# Altium PCB BOARD_4LAYER.PcbDoc (part 8 of 21)
Units mil, origin at the board's own origin, x right, y up, seen from the top; angles counter-clockwise.
Board outline 6692.91 x 10039.37 mil, 4 copper layers (Top Layer, Mid Layer 1, Mid Layer 2, Bottom Layer), stack 66.299 mil thick; 1532 components, 908 nets, 4105 pads, 1286 vias.
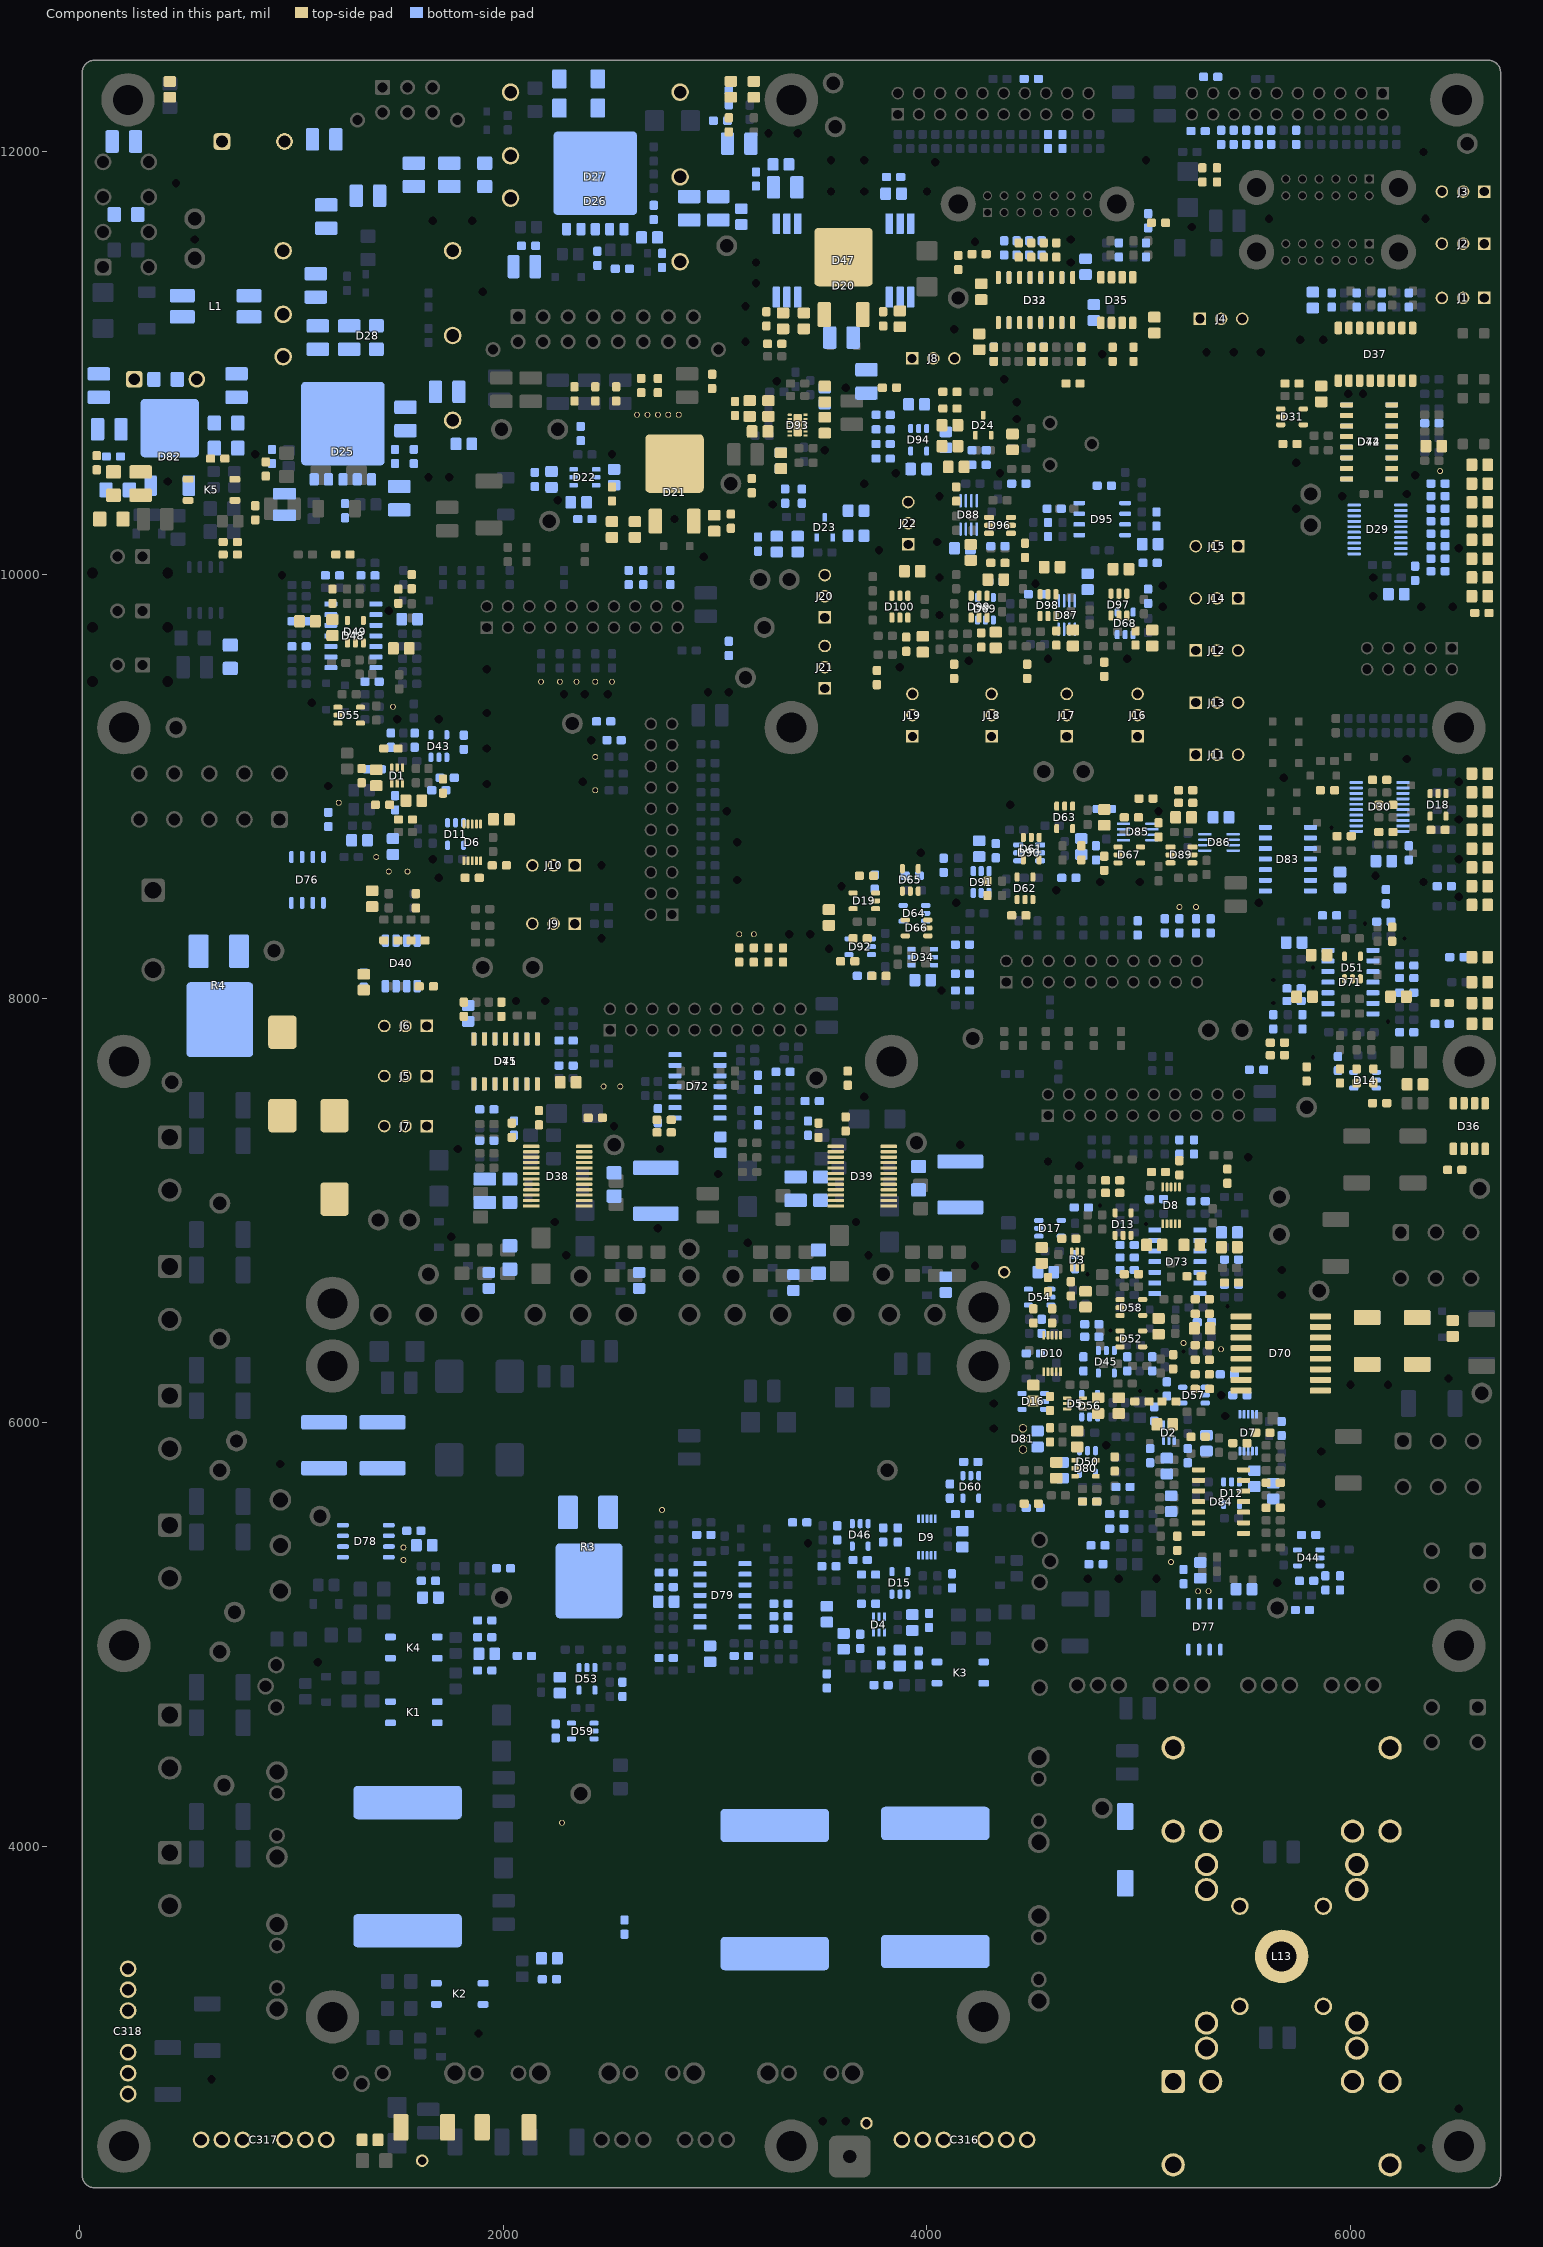
[diagram p10: the components of this part, seen from the top]

## Components (designator, comment, footprint, x,y, rotation, side; value= is the part's Value field where it differs from the comment) (continued)
C35 "CL10B104KB8SFNC" 0603-STANDART-1608 3281.5,11090.55 r180 top locked
C36 "CL10B104KB8SFNC" 0603-STANDART-1608 3842.52,11877.95 r0 bottom
C37 "CL10B104KB8SFNC" 0603-STANDART-1608 3192.91,11868.11 r90 bottom
C38 "CL10B104KB8SFNC" 0603-STANDART-1608 3793.31,11208.66 r90 top
C39 "CL10B104KB8SFNC" 0603-STANDART-1608 2149.61,10450.79 r90 bottom
C40 "CL10B104KB8SFNC" 0603-STANDART-1608 2385.83,10263.78 r180 bottom
C41 "CL10B104KB8SFNC" 0603-STANDART-1608 3064.96,12251.97 r270 bottom
C42 "CL10B104KB8SFNC" 0603-STANDART-1608 5368.11,11887.8 r270 top
C43 "CL10B104KB8SFNC" 0603-STANDART-1608 5299.21,11887.8 r270 top
C44 "CL10B104KB8SFNC" 0603-STANDART-1608 4147.64,11474.41 r90 top
C45 "CL10B104KB8SFNC" 0603-STANDART-1608 3409.45,10372.05 r270 bottom locked
C46 "CL10B104KB8SFNC" 0603-STANDART-1608 1490.16,10559.06 r90 bottom
C47 "CL10B104KB8SFNC" 0603-STANDART-1608 161.42,10559.06 r180 bottom
C48 "CL10B104KB8SFNC" 0603-STANDART-1608 2562.99,11444.88 r180 bottom
C49 "CL10B104KB8SFNC" 0603-STANDART-1608 2444.88,11494.09 r270 bottom
C50 "CL10B104KB8SFNC" 0603-STANDART-1608 2750,11484.25 r90 bottom
C51 "CL10B104KB8SFNC" 0603-STANDART-1608 3074.8,10253.94 r90 top
C52 "CL10B104KB8SFNC" 0603-STANDART-1608 879.92,10500 r270 top
C53 "CL10B104KB8SFNC" 0603-STANDART-1608 1253.94,10303.15 r270 bottom
C54 "CL10B104KB8SFNC" 0603-STANDART-1608 4875.98,7084.65 r180 top
C55 "CL10B104KB8SFNC" 0603-STANDART-1608 5732.28,8049.21 r0 bottom
C56 "CL10B104KB8SFNC" 0603-STANDART-1608 6263.78,8098.43 r180 bottom
C57 "CL10B104KB8SFNC" 0603-STANDART-1608 5938.98,7694.88 r270 bottom
C58 "CL10B104KB8SFNC" 0603-STANDART-1608 4944.88,6779.53 r0 bottom
C59 "CL10B104KB8SFNC" 0603-STANDART-1608 5437.01,6769.69 r180 bottom
C60 "CL10B104KB8SFNC" 0603-STANDART-1608 5299.21,6513.78 r0 top
C61 "CL10B104KB8SFNC" 0603-STANDART-1608 4964.57,6700.79 r0 top
C62 "CL10B104KB8SFNC" 0603-STANDART-1608 5437.01,6651.57 r180 bottom
C63 "CL10B104KB8SFNC" 0603-STANDART-1608 4118.11,5253.94 r90 bottom
C64 "CL10B104KB8SFNC" 0603-STANDART-1608 3311.02,5086.61 r180 bottom
C65 "CL10B104KB8SFNC" 0603-STANDART-1608 2769.68,5224.41 r0 bottom
C66 "CL10B104KB8SFNC" 0603-STANDART-1608 2248.03,4545.28 r90 bottom
C67 "CL10B104KB8SFNC" 0603-STANDART-1608 1647.64,5253.94 r180 bottom
C68 "CL10B104KB8SFNC" 0603-STANDART-1608 3960.63,4889.76 r270 bottom
C69 "CL10B104KB8SFNC" 0603-STANDART-1608 2769.68,5293.31 r0 bottom
C70 "CL10B104KB8SFNC" 0603-STANDART-1608 2218.5,3374.02 r180 bottom
C71 "CL10B104KB8SFNC" 0603-STANDART-1608 1913.39,4988.19 r180 bottom
C72 "CL10B104KB8SFNC" 0603-STANDART-1608 4501.97,6326.77 r180 bottom
C73 "CL10B104KB8SFNC" 0603-STANDART-1608 4698.82,6759.84 r90 bottom
C74 "CL10B104KB8SFNC" 0603-STANDART-1608 712.6,10155.51 r180 top
C75 "CL10B104KB8SFNC" 0603-STANDART-1608 6411.42,8797.24 r0 top
C76 "CL10B104KB8SFNC" 0603-STANDART-1608 5220.47,8925.2 r0 top
C77 "CL10B104KB8SFNC" 0603-STANDART-1608 4285.43,8521.65 r90 top
C78 "CL10B104KB8SFNC" 0603-STANDART-1608 4669.29,8570.87 r180 bottom
C79 "CL10B104KB8SFNC" 0603-STANDART-1608 3773.62,8108.27 r0 top
C80 "CL10B104KB8SFNC" 0603-STANDART-1608 4078.74,8629.92 r90 bottom
C81 "CL10B104KB8SFNC" 0603-STANDART-1608 4836.61,8895.67 r180 bottom
C82 "CL10B104KB8SFNC" 0603-STANDART-1608 4964.57,8856.3 r0 top
C83 "CL10B104KB8SFNC" 0603-STANDART-1608 3793.31,10618.11 r180 bottom
C84 "CL10B104KB8SFNC" 0603-STANDART-1608 3793.31,10755.91 r180 bottom
C85 "CL10B104KB8SFNC" 0603-STANDART-1608 4108.27,10785.43 r0 top
C86 "CL10B104KB8SFNC" 0603-STANDART-1608 4836.61,10421.26 r0 bottom
C87 "CL10B104KB8SFNC" 0603-STANDART-1608 5053.15,10057.09 r180 bottom
C88 "CL10B104KB8SFNC" 0603-STANDART-1608 4334.65,10057.09 r180 top
C89 "CL10B104KB8SFNC" 0603-STANDART-1608 4984.25,9702.76 r90 top
C90 "CL10B104KB8SFNC" 0603-STANDART-1608 4610.24,9702.76 r90 top
C91 "CL10B104KB8SFNC" 0603-STANDART-1608 4255.91,9692.91 r90 top
C92 "CL10B104KB8SFNC" 0603-STANDART-1608 3901.57,9673.23 r90 top
C93 "CL10B104KB8SFNC" 0603-STANDART-1608 4324.8,9968.5 r0 bottom
C94 "CL10B104KB8SFNC" 0603-STANDART-1608 5043.31,9899.61 r270 bottom
C95 "GRM1885C1H101JA01D" 0603-STANDART-1608 1431.1,8915.35 r0 top
C96 "GRM1885C1H101JA01D" 0603-STANDART-1608 5072.83,6041.34 r90 bottom
C97 "GRM1885C1H101JA01D" 0603-STANDART-1608 4669.29,6868.11 r0 top
C98 "GRM1885C1H101JA01D" 0603-STANDART-1608 3724.41,5145.67 r0 bottom
C99 "GRM1885C1H101JA01D" 0603-STANDART-1608 4767.72,5627.95 r180 top
C100 "GRM216R71H103KA01D" 0805-STANDART-2012 1401.57,9043.31 r90 top
C101 "GRM216R71H103KA01D" 0805-STANDART-2012 5131.89,5795.28 r90 bottom
C102 "GRM216R71H103KA01D" 0805-STANDART-2012 4748.03,6582.68 r90 top
C103 "GRM216R71H103KA01D" 0805-STANDART-2012 3606.3,4968.5 r270 bottom
C104 "CL21B225KOFNNNE" 0805-STANDART-2012 6391.73,10608.27 r180 top
C105 "CL21B225KOFNNNE" 0805-STANDART-2012 5860.24,10854.33 r270 top
C106 "CL21B225KOFNNNE" 0805-STANDART-2012 5072.83,11179.13 r270 top
C107 "CL21B225KOFNNNE" 0805-STANDART-2012 5820.87,11297.24 r90 bottom
C108 "CL21B225KOFNNNE" 0805-STANDART-2012 2307.09,7606.3 r180 top
C109 "CL21B225KOFNNNE" 0805-STANDART-2012 1992.13,8846.46 r180 top
C110 "CL21B225KOFNNNE" 0805-STANDART-2012 1578.74,8935.04 r180 top
C111 "CL21B225KOFNNNE" 0805-STANDART-2012 5545.28,5736.22 r90 bottom
C112 "CL21B225KOFNNNE" 0805-STANDART-2012 5318.9,5903.54 r90 bottom
C113 "CL21B225KOFNNNE" 0805-STANDART-2012 1194.88,9751.97 r90 top
C114 "CL21B225KOFNNNE" 0805-STANDART-2012 4639.76,5775.59 r270 bottom
C115 "CL21B225KOFNNNE" 0805-STANDART-2012 3124.02,11690.94 r270 bottom
C116 "CL21B225KOFNNNE" 0805-STANDART-2012 3872.05,11208.66 r90 top
C117 "CL21B225KOFNNNE" 0805-STANDART-2012 3320.87,11198.82 r90 top
C118 "CL21B225KOFNNNE" 0805-STANDART-2012 3311.02,11937.01 r180 bottom
C119 "CL21B225KOFNNNE" 0805-STANDART-2012 3842.52,11799.21 r0 bottom
C120 "CL21B225KOFNNNE" 0805-STANDART-2012 3665.35,10303.15 r180 bottom locked
C121 "CL21B225KOFNNNE" 0805-STANDART-2012 1814.96,10618.11 r180 bottom
C122 "CL21B225KOFNNNE" 0805-STANDART-2012 2996.06,10244.09 r90 top
C123 "CL21B225KOFNNNE" 0805-STANDART-2012 2513.78,10214.57 r90 top
C124 "CL21B225KOFNNNE" 0805-STANDART-2012 5250,6838.58 r0 top
C125 "CL21B225KOFNNNE" 0805-STANDART-2012 4541.34,6789.37 r270 top
C126 "CL21B225KOFNNNE" 0805-STANDART-2012 5092.52,6454.72 r90 top
C127 "CL21B225KOFNNNE" 0805-STANDART-2012 5850.39,8206.69 r0 top
C128 "CL21B225KOFNNNE" 0805-STANDART-2012 4167.32,5450.79 r270 bottom
C129 "CL21B225KOFNNNE" 0805-STANDART-2012 3931.1,5057.09 r90 bottom
C130 "CL21B225KOFNNNE" 0805-STANDART-2012 2267.72,4761.81 r270 bottom
C131 "CL21B225KOFNNNE" 0805-STANDART-2012 1923.23,4909.45 r180 bottom
C132 "CL21B225KOFNNNE" 0805-STANDART-2012 2218.5,3472.44 r180 bottom
C133 "CL21B225KOFNNNE" 0805-STANDART-2012 3872.05,4889.76 r270 bottom
C134 "CL21B225KOFNNNE" 0805-STANDART-2012 5948.82,8561.02 r270 bottom
C135 "CL21B225KOFNNNE" 0805-STANDART-2012 3537.4,8383.86 r270 top
C136 "CL21B225KOFNNNE" 0805-STANDART-2012 4561.02,6710.63 r180 bottom
C137 "CL21B225KOFNNNE" 0805-STANDART-2012 4905.51,6080.71 r90 top
C138 "CL21B225KOFNNNE" 0805-STANDART-2012 4501.97,6139.76 r90 top
C139 "CL21B225KOFNNNE" 0805-STANDART-2012 4521.65,5923.23 r90 bottom
C140 "CL21B225KOFNNNE" 0805-STANDART-2012 5210.63,8856.3 r0 top
C141 "CL21B225KOFNNNE" 0805-STANDART-2012 4728.35,8718.5 r270 bottom
C142 "CL21B225KOFNNNE" 0805-STANDART-2012 4246.06,8708.66 r270 bottom
C143 "CL21B225KOFNNNE" 0805-STANDART-2012 5387.8,8856.3 r180 bottom
C144 "CL21B225KOFNNNE" 0805-STANDART-2012 3517.72,10854.33 r270 top
C145 "CL21B225KOFNNNE" 0805-STANDART-2012 3517.72,10844.49 r270 bottom
C146 "CL21B225KOFNNNE" 0805-STANDART-2012 3163.39,10785.43 r270 top
C147 "CL21B225KOFNNNE" 0805-STANDART-2012 3311.02,10539.37 r270 top
C148 "CL21B225KOFNNNE" 0805-STANDART-2012 3311.02,10539.37 r270 bottom
C149 "CL21B225KOFNNNE" 0805-STANDART-2012 3950.79,10805.12 r180 bottom
C150 "CL21B225KOFNNNE" 0805-STANDART-2012 3960.63,10500 r180 bottom
C151 "CL21B225KOFNNNE" 0805-STANDART-2012 4108.27,10706.69 r0 top
C152 "CL21B225KOFNNNE" 0805-STANDART-2012 5053.15,10145.67 r180 bottom
C153 "CL21B225KOFNNNE" 0805-STANDART-2012 4206.69,10106.3 r90 top
C154 "CL21B225KOFNNNE" 0805-STANDART-2012 5062.99,9702.76 r90 top
C155 "CL21B225KOFNNNE" 0805-STANDART-2012 4688.98,9702.76 r90 top
C156 "CL21B225KOFNNNE" 0805-STANDART-2012 4324.8,9692.91 r90 top
C157 "CL21B225KOFNNNE" 0805-STANDART-2012 3980.32,9673.23 r90 top
C158 "CL21B225KOFNNNE" 0805-STANDART-2012 4167.32,10125.98 r180 bottom
C159 "CL21B225KOFNNNE" 0805-STANDART-2012 4757.87,9968.5 r270 bottom
C160 "CL21B106KOQNNNE" 0805-STANDART-2012 4246.06,11100.39 r270 top
C161 "CL21B106KOQNNNE" 0805-STANDART-2012 4255.91,11336.61 r270 top
C162 "CL21B106KOQNNNE" 0805-STANDART-2012 6214.57,9909.45 r0 bottom
C163 "CL21B106KOQNNNE" 0805-STANDART-2012 4748.03,11454.72 r90 bottom
C164 "CL21B106KOQNNNE" 0805-STANDART-2012 4787.4,11238.19 r270 bottom
C165 "CL21B106KOQNNNE" 0805-STANDART-2012 1381.89,8472.44 r90 top
C166 "CL21B106KOQNNNE" 0805-STANDART-2012 3025.59,7311.02 r270 bottom
C167 "CL21B106KOQNNNE" 0805-STANDART-2012 1342.52,8078.74 r90 top
C168 "CL21B106KOQNNNE" 0805-STANDART-2012 1834.65,7931.1 r270 bottom
C169 "CL21B106KOQNNNE" 0805-STANDART-2012 1519.68,9653.54 r0 top
C170 "CL21B106KOQNNNE" 0805-STANDART-2012 1076.77,9781.5 r180 top
C171 "CL21B106KOQNNNE" 0805-STANDART-2012 1322.83,8748.03 r0 bottom
C172 "CL21B106KOQNNNE" 0805-STANDART-2012 5151.57,5618.11 r90 bottom
C173 "CL21B106KOQNNNE" 0805-STANDART-2012 5633.86,5677.17 r90 bottom
C174 "CL21B106KOQNNNE" 0805-STANDART-2012 5496.06,5214.57 r0 bottom
C175 "CL21B106KOQNNNE" 0805-STANDART-2012 3419.29,11198.82 r270 top
C176 "CL21B106KOQNNNE" 0805-STANDART-2012 2228.35,10450.79 r270 bottom
C177 "CL21B106KOQNNNE" 0805-STANDART-2012 2356.3,10342.52 r0 bottom
C178 "CL21B106KOQNNNE" 0805-STANDART-2012 3389.76,10145.67 r90 bottom locked
C179 "CL21B106KOQNNNE" 0805-STANDART-2012 3291.34,10145.67 r90 bottom locked
C180 "CL21B106KOQNNNE" 0805-STANDART-2012 3665.35,10185.04 r0 bottom locked
C181 "CL21B106KOQNNNE" 0805-STANDART-2012 2622.05,10214.57 r270 top
C182 "CL21B106KOQNNNE" 0805-STANDART-2012 2690.94,11592.52 r0 bottom
C183 "CL21B106KOQNNNE" 0805-STANDART-2012 6224.41,8009.84 r0 top
C184 "CL21B106KOQNNNE" 0805-STANDART-2012 5781.5,8009.84 r180 top
C185 "CL21B106KOQNNNE" 0805-STANDART-2012 6303.15,7596.46 r180 top
C186 "CL21B106KOQNNNE" 0805-STANDART-2012 5427.17,6828.74 r0 top
C187 "CL21B106KOQNNNE" 0805-STANDART-2012 5072.83,6838.58 r0 top
C188 "CL21B106KOQNNNE" 0805-STANDART-2012 5299.21,6444.88 r180 top
C189 "CL21B106KOQNNNE" 0805-STANDART-2012 2769.68,5155.51 r180 bottom
C190 "CL21B106KOQNNNE" 0805-STANDART-2012 3527.56,5096.46 r90 bottom
C191 "CL21B106KOQNNNE" 0805-STANDART-2012 1657.48,5175.2 r0 bottom
C192 "CL21B106KOQNNNE" 0805-STANDART-2012 4836.61,8856.3 r90 top
C193 "CL21B106KOQNNNE" 0805-STANDART-2012 3980.32,8088.58 r0 bottom
C194 "CL21B106KOQNNNE" 0805-STANDART-2012 6155.51,8649.61 r180 bottom
C195 "CL21B106KOQNNNE" 0805-STANDART-2012 3251.97,10785.43 r90 top
C196 "CL21B106KOQNNNE" 0805-STANDART-2012 4137.8,10509.84 r180 top
C197 "CL21B106KOQNNNE" 0805-STANDART-2012 4403.54,10627.95 r90 top
C198 "CL21B106KOQNNNE" 0805-STANDART-2012 4108.27,10608.27 r180 top
C199 "GRM188R71H123KA01D" 0603-STANDART-1608 6618.11,9820.87 r0 top
C200 "GRM188R71H123KA01D" 0603-STANDART-1608 5043.31,11671.26 r270 bottom
C201 "GRM188R71H123KA01D" 0603-STANDART-1608 1342.52,8088.58 r270 bottom
C202 "GRM188R71H123KA01D" 0603-STANDART-1608 1736.22,9043.31 r180 bottom
C203 "GRM188R71H123KA01D" 0603-STANDART-1608 1814.96,9210.63 r90 bottom
C204 "GRM188R71H123KA01D" 0603-STANDART-1608 5948.82,5244.09 r90 bottom
C205 "GRM188R71H123KA01D" 0603-STANDART-1608 5801.18,5470.47 r180 bottom
C206 "GRM188R71H123KA01D" 0603-STANDART-1608 4738.19,6277.56 r270 bottom
C207 "GRM188R71H123KA01D" 0603-STANDART-1608 4777.56,6405.51 r0 bottom
C208 "GRM188R71H123KA01D" 0603-STANDART-1608 3862.2,5470.47 r90 bottom
C209 "GRM188R71H123KA01D" 0603-STANDART-1608 3685.04,5352.36 r180 bottom
C210 "GRM188R71H123KA01D" 0603-STANDART-1608 4167.32,5568.9 r0 bottom
C211 "GRM188R71H123KA01D" 0603-STANDART-1608 4885.83,5805.12 r90 top
C212 "GRM188R71H123KA01D" 0603-STANDART-1608 5092.52,8797.24 r90 top
C213 "GRM188R71H123KA01D" 0603-STANDART-1608 3753.94,8551.18 r90 bottom
C214 "GRM1885C1H100JA01D" 0603-STANDART-1608 1362.2,9998.03 r0 bottom
C215 "GRM1885C1H100JA01D" 0603-STANDART-1608 5279.53,5933.07 r180 top
C216 "GRM1885C1H100JA01D" 0603-STANDART-1608 5899.61,8393.7 r180 bottom
C217 "GRM1885C1H100JA01D" 0603-STANDART-1608 5279.53,7045.28 r0 bottom
C218 "GRM1885C1H100JA01D" 0603-STANDART-1608 2769.68,4889.76 r0 bottom
C219 "CL10C010BB8NNNC" 0603-STANDART-1608 5338.58,12350.39 r180 bottom
C220 "CL10C010BB8NNNC" 0603-STANDART-1608 4492.13,12340.55 r0 bottom
C221 "CL10C010BB8NNNC" 0603-STANDART-1608 3625.98,7625.98 r90 top
C222 "CL10C010BB8NNNC" 0603-STANDART-1608 1381.89,9496.06 r0 bottom
C223 "CL10C010BB8NNNC" 0603-STANDART-1608 1582.68,9220.47 r270 bottom
C224 "CL10C010BB8NNNC" 0603-STANDART-1608 1470.47,9220.47 r270 bottom
C225 "CL10C010BB8NNNC" 0603-STANDART-1608 1194.88,9998.03 r180 bottom
C226 "CL10C010BB8NNNC" 0603-STANDART-1608 5181.1,5431.1 r270 top
C227 "CL10C010BB8NNNC" 0603-STANDART-1608 5791.34,5253.94 r0 bottom
C228 "CL10C010BB8NNNC" 0603-STANDART-1608 5771.65,5116.14 r0 bottom
C229 "CL10C010BB8NNNC" 0603-STANDART-1608 5476.38,5903.54 r0 top
C230 "CL10C010BB8NNNC" 0603-STANDART-1608 5791.34,7645.67 r90 top
C231 "CL10C010BB8NNNC" 0603-STANDART-1608 3064.96,9653.54 r270 bottom
C232 "CL10C010BB8NNNC" 0603-STANDART-1608 6263.78,7842.52 r0 bottom
C233 "CL10C010BB8NNNC" 0603-STANDART-1608 6155.51,8364.17 r180 bottom
C234 "CL10C010BB8NNNC" 0603-STANDART-1608 5633.86,7891.73 r270 bottom
C235 "CL10C010BB8NNNC" 0603-STANDART-1608 5771.65,7891.73 r270 bottom
C236 "CL10C010BB8NNNC" 0603-STANDART-1608 6490.16,7192.91 r0 top
C237 "CL10C010BB8NNNC" 0603-STANDART-1608 5309.06,6474.41 r0 bottom
C238 "CL10C010BB8NNNC" 0603-STANDART-1608 4944.88,6277.56 r90 bottom
C239 "CL10C010BB8NNNC" 0603-STANDART-1608 5062.99,6277.56 r90 bottom
C240 "CL10C010BB8NNNC" 0603-STANDART-1608 5082.68,7055.12 r180 bottom
C241 "CL10C010BB8NNNC" 0603-STANDART-1608 2946.85,5470.47 r0 bottom
C242 "CL10C010BB8NNNC" 0603-STANDART-1608 3576.77,5480.31 r90 bottom
C243 "CL10C010BB8NNNC" 0603-STANDART-1608 3537.4,5322.83 r180 bottom
C244 "CL10C010BB8NNNC" 0603-STANDART-1608 3124.02,4899.61 r0 bottom
C245 "CL10C010BB8NNNC" 0603-STANDART-1608 5653.54,7793.31 r0 top
C246 "CL10C010BB8NNNC" 0603-STANDART-1608 2474.41,9309.06 r0 bottom
C247 "C1808X102KHRACTU" 1808-STANDART-4520 2356.3,12202.76 r180 bottom
C248 "C1808X102KHRACTU" 1808-STANDART-4520 2356.3,12340.55 r180 bottom
C249 "C1206C104K1RACTU" 1206-STANDART-3216 220.47,11700.79 r180 bottom
C250 "C1206C104K1RACTU" 1206-STANDART-3216 407.48,10923.23 r180 bottom
C251 "C1206C104K1RACTU" 1206-STANDART-3216 1913.39,11887.8 r270 bottom
C252 "C1206C104K1RACTU" 1206-STANDART-3216 1401.57,11120.08 r270 bottom
C253 "C1206C104K1RACTU" 1206-STANDART-3216 692.91,10716.54 r180 bottom
C254 "C1206C104K1RACTU" 1206-STANDART-3216 161.42,10431.1 r90 top
C255 "C1206C104K1RACTU" 1206-STANDART-3216 712.6,9614.17 r90 bottom
C256 "C1206C104K1RACTU" 1206-STANDART-3216 151.57,10263.78 r0 top
C257 "GRM32DR71E106KA12L" 1210-STANDART-3225 3379.92,7104.33 r270 bottom
C258 "GRM32DR71E106KA12L" 1210-STANDART-3225 1913.39,7094.49 r270 bottom
C259 "GRM32DR71E106KA12L" 1210-STANDART-3225 3330.71,11828.74 r180 bottom
C260 "GRM32DR71E106KA12L" 1210-STANDART-3225 3015.75,11730.32 r270 bottom
C261 "GRM32DR71E106KA12L" 1210-STANDART-3225 1736.22,10864.17 r180 bottom
C262 "GRM32DR71E106KA12L" 1210-STANDART-3225 1509.84,10362.2 r270 bottom
C263 "CC0805KKX7R7BB105" 0805-STANDART-2012 2523.62,10460.63 r90 bottom
C264 "CC0805KKX7R7BB105" 0805-STANDART-2012 4610.24,5775.59 r270 top
C265 "CC0805KKX7R7BB105" 0805-STANDART-2012 4708.66,5923.23 r90 top
C266 "CC0805KKX7R7BB105" 0805-STANDART-2012 4807.09,6080.71 r90 top
C267 "CC0805KKX7R7BB105" 0805-STANDART-2012 3517.72,10706.69 r270 top
C268 "CC0805KKX7R7BB105" 0805-STANDART-2012 4915.35,10027.56 r0 top
C269 "CC0805KKX7R7BB105" 0805-STANDART-2012 4590.55,10037.4 r0 top
C270 "CC0805KKX7R7BB105" 0805-STANDART-2012 4324.8,9978.35 r0 top
C271 "CC0805KKX7R7BB105" 0805-STANDART-2012 3931.1,10017.72 r0 top
C272 "GRM1885C1H471JA01D" 0603-STANDART-1608 909.45,10559.06 r270 bottom
C273 "GRM1885C1H471JA01D" 0603-STANDART-1608 2120.08,11553.15 r0 bottom
C274 "MAL214658471E3" CAP-EL-L7.5-D18,0 407.48,10923.23 r0 top locked
C275 "MAL214658471E3" CAP-EL-L7.5-D18,0 820.87,12045.28 r0 top locked
C276 "C3225X7S1H106M250AB" 1210-STANDART-3225 1746.06,11887.8 r270 bottom
C277 "C3225X7S1H106M250AB" 1210-STANDART-3225 1578.74,11887.8 r270 bottom
C278 "C3225X7S1H106M250AB" 1210-STANDART-3225 1125.98,11120.08 r270 bottom
C279 "C3225X7S1H106M250AB" 1210-STANDART-3225 1273.62,11120.08 r270 bottom
C280 "C3225X7S1H106M250AB" 1210-STANDART-3225 210.63,12045.28 r180 bottom
C281 "C3225X7S1H106M250AB" 1210-STANDART-3225 141.73,10687.01 r180 bottom
C282 "C0805C151K5RACTU" 0805-STANDART-2012 2641.73,6671.26 r270 bottom
C283 "C0805C151K5RACTU" 0805-STANDART-2012 1933.07,6671.26 r270 bottom
C284 "C0805C151K5RACTU" 0805-STANDART-2012 4088.58,6651.57 r270 bottom
C285 "C0805C151K5RACTU" 0805-STANDART-2012 3370.08,6661.42 r270 bottom
C286 "GRM1885C1H102JA01D" 0603-STANDART-1608 6273.62,11297.24 r90 bottom
C287 "GRM1885C1H102JA01D" 0603-STANDART-1608 6145.67,11297.24 r90 bottom
C288 "GRM1885C1H102JA01D" 0603-STANDART-1608 6027.56,11297.24 r90 bottom
C289 "GRM1885C1H102JA01D" 0603-STANDART-1608 5909.45,11297.24 r90 bottom
C290 "GRM1885C1H102JA01D" 0603-STANDART-1608 5033.46,11533.46 r90 bottom
C291 "GRM1885C1H102JA01D" 0603-STANDART-1608 4905.51,11533.46 r90 bottom
C292 "GRM1885C1H102JA01D" 0603-STANDART-1608 1470.47,8275.59 r0 top
C293 "GRM1885C1H102JA01D" 0603-STANDART-1608 1598.43,8275.59 r180 top
C294 "GRM1885C1H102JA01D" 0603-STANDART-1608 1194.88,9899.61 r90 top
C295 "GRM1885C1H102JA01D" 0603-STANDART-1608 4925.2,5696.85 r0 bottom
C296 "GRM1885C1H102JA01D" 0603-STANDART-1608 6194.88,8305.12 r270 top
C297 "GRM1885C1H102JA01D" 0603-STANDART-1608 5299.21,6297.24 r180 top
C298 "GRM1885C1H102JA01D" 0603-STANDART-1608 5161.42,6287.4 r270 top
C299 "GRM1885C1H102JA01D" 0603-STANDART-1608 2562.99,4742.13 r90 bottom
C300 "GRM1885C1H102JA01D" 0603-STANDART-1608 4541.34,6454.72 r270 bottom
C301 "C5750X6S2W225K250KA" 2220STANDART5650 2720.47,7094.49 r90 bottom
C302 "C5750X6S2W225K250KA" 2220STANDART5650 4157.48,7124.02 r90 bottom
C303 "C3216X7T2W104M160AE" 1206-STANDART-3216 2523.62,7124.02 r90 bottom
C304 "C3216X7T2W104M160AE" 1206-STANDART-3216 3960.63,7153.54 r90 bottom
C305 "C2220C102JZGACTU" 2220STANDART5650 1431.1,5893.7 r270 bottom
C306 "C2220C102JZGACTU" 2220STANDART5650 1155.51,5893.7 r270 bottom
C307 "C3216X7R1H334M160AA" 1206-STANDART-3216 2031.5,6779.53 r90 bottom
C308 "C3216X7R1H334M160AA" 1206-STANDART-3216 3488.19,6759.84 r90 bottom
C309 "TAJB226M020RNJ" TAJ-B 2100.39,11454.72 r180 bottom
C310 "TAJB226M020RNJ" TAJ-B 968.5,10332.68 r90 bottom
C311 "C0805C822K5RACTU" 0805-STANDART-2012 1559.06,9791.34 r180 bottom
C312 "C0805C822K5RACTU" 0805-STANDART-2012 5122.05,5992.13 r0 top
C313 "C0805C822K5RACTU" 0805-STANDART-2012 5732.28,8265.75 r0 bottom
C314 "C0805C822K5RACTU" 0805-STANDART-2012 5427.17,6897.64 r180 bottom
C315 "C0805C822K5RACTU" 0805-STANDART-2012 2976.38,4909.45 r90 bottom
C316 "R46KI22200001K1" CAP_PP_L15mm_UNIVER_V1 4177.17,2616.14 r180 top locked
C317 "R46KI22200001K1" CAP_PP_L15mm_UNIVER_V1 870.08,2616.14 r180 top locked
C318 "R46KI22200001K1" CAP_PP_L15mm_UNIVER_V1 230.31,3127.95 r90 top
C319 "C3216X5R1E476M160AC" 1206-STANDART-3216 3498.03,7104.33 r270 bottom
C320 "C3216X5R1E476M160AC" 1206-STANDART-3216 2031.5,7094.49 r270 bottom
C321 "GRM21BR71H224KA01L" 0805-STANDART-2012 1480.32,8718.5 r270 bottom
C322 "GRM21BR71H224KA01L" 0805-STANDART-2012 5289.37,5303.15 r270 bottom
C323 "GRM21BR71H224KA01L" 0805-STANDART-2012 1627.95,5421.26 r180 bottom
C324 "GRM31CR71H225KA88L" 1206-STANDART-3216 692.91,10598.43 r180 bottom
C325 "GRM31CR71H225KA88L" 1206-STANDART-3216 181.1,10401.57 r0 bottom
C326 "CGA4J3X7R1C475K125AB" 0805-STANDART-2012 3212.6,10677.17 r0 top
C327 "C0805C103K5RACTU" 0805-STANDART-2012 4088.58,10637.8 r270 bottom
C328 "GRM1885C1H330JA01D" 0603-STANDART-1608 5082.68,10263.78 r90 bottom
C329 "GRM1885C1H330JA01D" 0603-STANDART-1608 4570.87,10214.57 r90 bottom
D1 "ADM1087AKSZ-REEL7" SC-70-KS-6-AD 1500,9053.15 r180 top
D2 "ADM1087AKSZ-REEL7" SC-70-KS-6-AD 5141.73,5952.76 r180 bottom
D3 "ADM1087AKSZ-REEL7" SC-70-KS-6-AD 4708.66,6769.69 r0 top
D4 "ADM1087AKSZ-REEL7" SC-70-KS-6-AD 3773.62,5047.24 r180 bottom
D5 "ADM1087AKSZ-REEL7" SC-70-KS-6-AD 4698.82,6090.55 r270 top
D6 "ADG736BRMZ-REEL7" MSOP-RM-10-AD#1 1854.33,8738.19 r0 top
D7 "ADG736BRMZ-REEL7" MSOP-RM-10-AD#2 5515.75,5952.76 r0 bottom
D8 "ADG736BRMZ-REEL7" MSOP-RM-10-AD#1 5151.57,7025.59 r180 top
D9 "ADG736BRMZ-REEL7" MSOP-RM-10-AD#2 4000,5460.63 r0 bottom
D10 "ADG736BRMZ-REEL7" MSOP-RM-10-AD#1 4590.55,6326.77 r180 top locked
D11 "SN74LVC1G08DBVR" SOT-23-DBV-R-PDSO-G5-TI 1775.59,8777.56 r0 bottom
D12 "SN74LVC1G08DBVR" SOT-23-DBV-R-PDSO-G5-TI 5437.01,5667.32 r0 bottom
D13 "SN74LVC1G08DBVR" SOT-23-DBV-R-PDSO-G5-TI 4925.2,6937.01 r0 top
D14 "SN74LVC1G08DBVR" SOT-23-DBV-R-PDSO-G5-TI 6066.93,7616.14 r270 bottom
D15 "SN74LVC1G08DBVR" SOT-23-DBV-R-PDSO-G5-TI 3872.05,5244.09 r180 bottom
D16 "SN74LVC1G08DBVR" SOT-23-DBV-R-PDSO-G5-TI 4501.97,6100.39 r270 bottom
D17 "SN74LVC1G08DBVR" SOT-23-DBV-R-PDSO-G5-TI 4580.71,6917.32 r90 bottom
D18 "SN74LVC1G08DBVR" SOT-23-DBV-R-PDSO-G5-TI 6411.42,8915.35 r180 top
D19 "SN74LVC1G08DBVR" SOT-23-DBV-R-PDSO-G5-TI 3704.72,8462.6 r90 top
D20 "NCP5501DT50RKG" DPAK-3-TO252-ONSEMI 3606.3,11228.35 r0 top locked
D21 "NCP5501DT50RKG" DPAK-3-TO252-ONSEMI 2809.06,10253.94 r0 top locked
D22 "LM2776DBVR" DBV_R-PDSO-G6 2385.83,10460.63 r90 bottom
D23 "AD1582BRTZ-REEL7" SOT-23-RT-3-AD 3517.72,10224.41 r180 bottom locked
D24 "AD1582BRTZ-REEL7" SOT-23-RT-3-AD 4265.75,10706.69 r0 top
D25 "BA00DD0WHFP-TR" HRP-5 1244.09,10450.79 r180 bottom locked
D26 "BA00DD0WHFP-TR" HRP-5 2435.04,11631.89 r180 bottom locked
D27 "PDQ10-Q24-S5-D" THN-30 2435.04,11877.95 r0 top locked
D28 "PDQ10-Q24-S15-D" THN-30 1362.2,11129.92 r0 top locked
D29 "SN74HC245PWR" PW-R-PDSO-G20 6125.98,10214.57 r90 bottom
D30 "SN74HC245PWR" PW-R-PDSO-G20 6135.83,8905.51 r90 bottom locked
D31 "SN74LVC1G00DBVR" SOT-23-DBV-R-PDSO-G5-TI 5722.44,10746.06 r270 top
D32 "SI8640BB-B-IS1" SOIC-16-SIL-LAB-NB 4512.01,11297.24 r180 bottom
D33 "SI8640BB-B-IS1" SOIC-16-SIL-LAB-NB 4511.81,11297.24 r0 top
D34 "SN74LVC1G332DBVR" DBV_R-PDSO-G6 3980.32,8196.85 r270 bottom
D35 "MOCD207R2M" 8-SOIC-VISHAY 4895.67,11297.24 r180 top
D36 "MOCD207R2M" 8-SOIC-VISHAY 6559.06,7399.61 r0 top
D37 "ACPL-247-500E" 16-SOIC-VISHAY 6116.14,11041.34 r180 top locked
D38 "IR2114SSPBF" SSOP-24-IR 2257.87,7163.39 r270 top locked
D39 "IR2114SSPBF" SSOP-24-IR 3694.88,7163.39 r270 top locked
D40 "TLP2160(F)" 8-SOIC-VISHAY 1519.68,8167.32 r0 bottom
D41 "CD4041UBM" D_R_PDSO_G14 2011.81,7704.72 r0 bottom locked
D42 "SN74LVC138ADR" D_R_PDSO-G16 6086.61,10627.95 r270 bottom
D43 "LMH6642MF/NOPB" SOT-23-DBV-R-PDSO-G5-TI 1696.85,9192.91 r180 bottom
D44 "LMH6642MF/NOPB" SOT-23-DBV-R-PDSO-G5-TI 5801.18,5362.2 r270 bottom
D45 "LMH6642MF/NOPB" SOT-23-DBV-R-PDSO-G5-TI 4846.46,6287.4 r0 bottom
D46 "LMH6642MF/NOPB" SOT-23-DBV-R-PDSO-G5-TI 3685.04,5470.47 r0 bottom
D47 "DCP020505U" DVB-R-PDSO-G12/G28 3606.3,11484.25 r0 bottom
D48 "LMH6644MAX/NOPB_2" D_R_PDSO_G14 1293.31,9712.6 r90 bottom locked
D49 "TLV3701QDBVRG4Q1" SOT-23-DBV-R-PDSO-G5-TI 1303.15,9732.28 r0 top
D50 "TLV3701QDBVRG4Q1" SOT-23-DBV-R-PDSO-G5-TI 4757.87,5814.96 r0 bottom
D51 "TLV3701QDBVRG4Q1" SOT-23-DBV-R-PDSO-G5-TI 6007.87,8147.64 r0 top
D52 "TLV3701QDBVRG4Q1" SOT-23-DBV-R-PDSO-G5-TI 4964.57,6395.67 r270 top
D53 "TLV3701QDBVRG4Q1" SOT-23-DBV-R-PDSO-G5-TI 2395.67,4791.34 r0 bottom
D54 "TLV3701QDBVRG4Q1" SOT-23-DBV-R-PDSO-G5-TI 4531.5,6592.52 r270 bottom
D55 "SN74AHCT1G00DBVR" SOT-23-DBV-R-PDSO-G5-TI 1273.62,9338.58 r270 top
D56 "SN74AHCT1G00DBVR" SOT-23-DBV-R-PDSO-G5-TI 4767.72,6080.71 r180 bottom
D57 "SN74AHCT1G00DBVR" SOT-23-DBV-R-PDSO-G5-TI 5259.84,6129.92 r270 bottom
D58 "SN74AHCT1G00DBVR" SOT-23-DBV-R-PDSO-G5-TI 4964.57,6543.31 r270 top
D59 "SN74AHCT1G00DBVR" SOT-23-DBV-R-PDSO-G5-TI 2375.98,4545.28 r270 bottom
D60 "SN74AHCT1G00DBVR" SOT-23-DBV-R-PDSO-G5-TI 4206.69,5696.85 r0 bottom
D61 "SN74AHCT1G00DBVR" SOT-23-DBV-R-PDSO-G5-TI 4492.13,8708.66 r180 top
D62 "SN74AHCT1G00DBVR" SOT-23-DBV-R-PDSO-G5-TI 4462.6,8521.65 r0 top
D63 "SN74AHCT1G00DBVR" SOT-23-DBV-R-PDSO-G5-TI 4649.61,8856.3 r180 top
D64 "SN74AHCT1G00DBVR" SOT-23-DBV-R-PDSO-G5-TI 3940.94,8403.54 r270 bottom
D65 "SN74AHCT1G00DBVR" SOT-23-DBV-R-PDSO-G5-TI 3921.26,8561.02 r0 top
D66 "SN74AHCT1G00DBVR" SOT-23-DBV-R-PDSO-G5-TI 3950.79,8334.65 r90 top
D67 "SN74AHCT1G00DBVR" SOT-23-DBV-R-PDSO-G5-TI 4954.72,8679.13 r270 top
D68 "SN74AHCT1G00DBVR" SOT-23-DBV-R-PDSO-G5-TI 4935.04,9771.65 r180 bottom
D69 "SN74AHCT1G00DBVR" SOT-23-DBV-R-PDSO-G5-TI 4275.59,9840.55 r180 bottom
D70 "ACS724KMATR-65AB-T" 16-SOIC-7mm5W-Allegro 5669.29,6326.77 r90 top
D71 "LMH6644MAX/NOPB_3" D_R_PDSO_G14 5998.03,8078.74 r90 bottom
D72 "SN74LV08ADR" D_R_PDSO_G14 2917.32,7586.61 r90 bottom locked
D73 "LMH6644MAX/NOPB_4" D_R_PDSO_G14 5181.1,6759.84 r90 bottom locked
D74 "SN74HC175DR" D_R_PDSO-G16 6086.61,10627.95 r90 top
D75 "SN74HC21DR" D_R_PDSO_G14 2011.81,7704.72 r180 top locked
D76 "ACS730KLCTR-40AB-T" SOIC-8-AD-R8 1076.77,8561.02 r180 bottom
D77 "ACS730KLCTR-40AB-T" SOIC-8-AD-R8 5309.06,5037.4 r180 bottom locked
D78 "ACS730KLCTR-40AB-T" SOIC-8-AD-R8 1352.36,5440.94 r90 bottom
D79 "LMH6644MAX/NOPB" D_R_PDSO_G14 3035.43,5185.04 r270 bottom
D80 "AD8628AUJZ-R2" TSOT-5-UJ-5-AD 4748.03,5785.43 r270 top locked
D81 "TMP36GT9Z" TO-92_3_T-3-1_AD 4452.76,5923.23 r270 top locked
D82 "LM317MABDTG" DPAK-TO252-DIODES-IR 427.17,10421.26 r180 bottom locked
D83 "SN74HC20DR" D_R_PDSO_G14 5702.76,8659.45 r90 bottom
D84 "LMH6644MAX/NOPB_1" D_R_PDSO_G14 5387.8,5627.95 r90 top
D85 "SN74LVC2G00DCTR" DCT_R_PDSO_G8_TI_SM8 4994.09,8787.4 r270 bottom
D86 "SN74LVC2G00DCTR" DCT_R_PDSO_G8_TI_SM8 5377.95,8738.19 r270 bottom
D87 "SN74LVC2G00DCTR" DCT_R_PDSO_G8_TI_SM8 4659.45,9811.02 r180 bottom
D88 "SN74LVC2G00DCTR" DCT_R_PDSO_G8_TI_SM8 4196.85,10283.46 r0 bottom
D89 "LTC6993IS6-2#TRMPBF" SOT23-6-LT 5200.79,8679.13 r270 top
D90 "LTC6993IS6-2#TRMPBF" SOT23-6-LT 4482.28,8688.98 r90 bottom
D91 "LTC6993IS6-2#TRMPBF" SOT23-6-LT 4255.91,8551.18 r180 bottom
D92 "SN74LVC1G32DBVR" SOT-23-DBV-R-PDSO-G5-TI 3685.04,8246.06 r270 bottom
D93 "LM27762DSST" "12-WFDFN_3mmx2mm_Exposed Pad" 3389.76,10706.69 r270 top locked
D94 "TPS73030DBVT" SOT-23-DBV-R-PDSO-G5-TI 3960.63,10637.8 r0 bottom
D95 "AD8629ARZ-REEL7" SOIC-8-AD-R8 4826.77,10263.78 r90 bottom
D96 "LTC6990HS6#TRMPBF" SOT23-6-LT 4344.49,10234.25 r90 top
D97 "LTC6991HS6#TRMPBF" SOT23-6-LT 4905.51,9860.24 r180 top
D98 "LTC6991HS6#TRMPBF" SOT23-6-LT 4570.87,9857.48 r180 top
D99 "LTC6991HS6#TRMPBF" SOT23-6-LT 4246.06,9850.39 r180 top
D100 "LTC6991HS6#TRMPBF" SOT23-6-LT 3872.05,9850.39 r180 top
FB1 "MMZ1608A182B" 0603-STANDART-1608 4688.98,10903.54 r180 top
FB2 "MMZ1608A182B" 0603-STANDART-1608 1637.8,8059.06 r180 top
FB3 "MMZ1608A182B" 0603-STANDART-1608 1588.58,8462.6 r90 top
FB4 "MMZ1608A182B" 0603-STANDART-1608 1539.37,8846.46 r180 top
FB5 "MMZ1608A182B" 0603-STANDART-1608 1716.54,9003.94 r270 top
FB6 "MMZ1608A182B" 0603-STANDART-1608 1505.91,9899.61 r270 top
FB7 "MMZ1608A182B" 0603-STANDART-1608 1244.09,10096.46 r180 top
FB8 "MMZ1608A182B" 0603-STANDART-1608 1568.9,9968.5 r270 top
FB9 "MMZ1608A182B" 0603-STANDART-1608 1391.73,9082.68 r180 bottom
FB10 "MMZ1608A182B" 0603-STANDART-1608 5673.23,5972.44 r90 bottom
FB11 "MMZ1608A182B" 0603-STANDART-1608 5141.73,6100.39 r180 top
FB12 "MMZ1608A182B" 0603-STANDART-1608 4767.72,5627.95 r0 bottom
FB13 "MMZ1608A182B" 0603-STANDART-1608 4895.67,5500 r0 bottom
FB14 "MMZ1608A182B" 0603-STANDART-1608 4895.67,5568.9 r0 bottom
FB15 "MMZ1608A182B" 0603-STANDART-1608 4807.09,5421.26 r0 bottom
FB16 "MMZ1608A182B" 0603-STANDART-1608 4797.24,5332.68 r0 bottom
FB17 "MMZ1608A182B" 0603-STANDART-1608 1490.16,8925.2 r90 bottom
FB18 "MMZ1608A182B" 0603-STANDART-1608 3330.71,10372.05 r90 bottom locked
FB19 "MMZ1608A182B" 0603-STANDART-1608 5417.32,7163.39 r90 top
FB20 "MMZ1608A182B" 0603-STANDART-1608 4875.98,7143.7 r0 top
FB21 "MMZ1608A182B" 0603-STANDART-1608 6027.56,7635.83 r90 top
FB22 "MMZ1608A182B" 0603-STANDART-1608 6106.3,7635.83 r90 top
FB23 "MMZ1608A182B" 0603-STANDART-1608 5948.82,7635.83 r90 top
FB24 "MMZ1608A182B" 0603-STANDART-1608 5259.84,6690.94 r180 top
FB25 "MMZ1608A182B" 0603-STANDART-1608 5437.01,6661.42 r0 top
FB26 "MMZ1608A182B" 0603-STANDART-1608 5299.21,6582.68 r180 top
FB27 "MMZ1608A182B" 0603-STANDART-1608 5584.65,5952.76 r180 top
FB28 "MMZ1608A182B" 0603-STANDART-1608 6135.83,7507.87 r0 top
FB29 "MMZ1608A182B" 0603-STANDART-1608 4501.97,5598.43 r0 bottom
FB30 "MMZ1608A182B" 0603-STANDART-1608 3724.41,5283.46 r0 bottom
FB31 "MMZ1608A182B" 0603-STANDART-1608 2100.39,4899.61 r0 bottom
FB32 "MMZ1608A182B" 0603-STANDART-1608 3527.56,4781.5 r90 bottom
FB33 "MMZ1608A182B" 0603-STANDART-1608 3399.61,5529.53 r180 bottom
FB34 "MMZ1608A182B" 0603-STANDART-1608 2001.97,5312.99 r180 bottom
FB35 "MMZ1608A182B" 0603-STANDART-1608 3783.46,4761.81 r0 bottom
FB36 "MMZ1608A182B" 0603-STANDART-1608 2572.83,3620.08 r270 bottom
FB37 "MMZ1608A182B" 0603-STANDART-1608 1913.39,4830.71 r180 bottom
FB38 "MMZ1608A182B" 0603-STANDART-1608 1913.39,5066.93 r180 bottom
FB39 "MMZ1608A182B" 0603-STANDART-1608 4492.13,5618.11 r0 top
FB40 "MMZ1608A182B" 0603-STANDART-1608 5013.78,6100.39 r0 top
FB41 "MMZ1608A182B" 0603-STANDART-1608 4728.35,7015.75 r180 bottom
FB42 "MMZ1608A182B" 0603-STANDART-1608 712.6,10096.46 r180 top
FB43 "MMZ1608A182B" 0603-STANDART-1608 6165.35,8482.28 r270 bottom
FB44 "MMZ1608A182B" 0603-STANDART-1608 5220.47,8984.25 r180 top
FB45 "MMZ1608A182B" 0603-STANDART-1608 4797.24,8688.98 r90 bottom
FB46 "MMZ1608A182B" 0603-STANDART-1608 5033.46,8944.88 r180 top
FB47 "MMZ1608A182B" 0603-STANDART-1608 3714.57,8580.71 r0 top
FB48 "MMZ1608A182B" 0603-STANDART-1608 4324.8,8698.82 r90 bottom
FB49 "MMZ1608A182B" 0603-STANDART-1608 3793.31,10687.01 r0 bottom
FB50 "MMZ1608A182B" 0603-STANDART-1608 3793.31,10549.21 r180 bottom
FB51 "MMZ1608A182B" 0603-STANDART-1608 4108.27,10864.17 r180 top
FB52 "MMZ1608A182B" 0603-STANDART-1608 4246.06,10588.58 r180 bottom
FB53 "MMZ1608A182B" 0603-STANDART-1608 4137.8,10381.89 r90 top
FB54 "MMZ1608A182B" 0603-STANDART-1608 4836.61,9555.12 r270 top
FB55 "MMZ1608A182B" 0603-STANDART-1608 4472.44,9545.28 r270 top
FB56 "MMZ1608A182B" 0603-STANDART-1608 4127.95,9545.28 r270 top
FB57 "MMZ1608A182B" 0603-STANDART-1608 3763.78,9515.75 r270 top
FB58 "MMZ1608A182B" 0603-STANDART-1608 4433.07,10431.1 r0 bottom
FB59 "MMZ1608A182B" 0603-STANDART-1608 4246.06,10519.68 r180 bottom
FB60 "MMZ1608S102A" 0603-STANDART-1608 5712.6,10618.11 r180 top
FB61 "MMZ1608S102A" 0603-STANDART-1608 3242.13,11208.66 r90 top
FB62 "MMZ1608S102A" 0603-STANDART-1608 2366.14,10667.32 r270 bottom
FB63 "MMZ1608S102A" 0603-STANDART-1608 4246.06,11513.78 r0 top
FB64 "MMZ1608S102A" 0603-STANDART-1608 5092.52,11661.42 r0 top
FB65 "MMZ1608S102A" 0603-STANDART-1608 2513.78,10381.89 r270 top
FB66 "MPZ1608S221A_1" 0603-STANDART-1608 2051.18,7389.76 r90 bottom
FB67 "MPZ1608S221A_1" 0603-STANDART-1608 3438.5,7389.76 r90 bottom
FB68 "MPZ1608S221A_1" 0603-STANDART-1608 3458.66,7517.72 r0 bottom
FB69 "MPZ1608S221A_1" 0603-STANDART-1608 3320.87,7655.51 r180 bottom
FB70 "MPZ1608S221A_1" 0603-STANDART-1608 1923.23,7330.71 r0 bottom
FB71 "MPZ1608S221A_1" 0603-STANDART-1608 1923.23,7478.35 r180 bottom
FB72 "MPZ1608S221A_1" 0603-STANDART-1608 830.71,10293.31 r270 top
FB73 "MPZ1608S221A_1" 0603-STANDART-1608 1578.74,10559.06 r270 bottom
FB74 "MPZ1608S221A_1" 0603-STANDART-1608 3025.59,12143.7 r180 bottom
FB75 "MPZ1608S221A_1" 0603-STANDART-1608 2710.63,11710.63 r270 bottom
FB76 "MPZ1608S221A_1" 0603-STANDART-1608 82.68,10529.53 r270 top
FB77 "MPZ1608S221A_1" 0603-STANDART-1608 3822.83,10883.86 r0 top
FB78 "MPZ1608S221A_1" 0603-STANDART-1608 3173.23,10421.26 r270 top
FB79 "MPZ1608S221A_1" 0603-STANDART-1608 3094.49,10785.43 r270 top
FB80 "35F0121-1SR-10" 2-SMD_J-Lead 4935.04,3984.25 r270 bottom
H1 "APT2012SRCPRV" 0805-STANDART-2012-SVET 6480.31,6444.88 r90 top
H2 "APT2012SRCPRV" 0805-STANDART-2012-SVET 1372.05,2616.14 r180 top
H3 "APT2012SRCPRV" 0805-STANDART-2012-SVET 6608.27,8531.5 r180 top
H4 "APT2012SRCPRV" 0805-STANDART-2012-SVET 6608.27,8620.08 r180 top
H5 "APT2012SRCPRV" 0805-STANDART-2012-SVET 6608.27,8885.83 r180 top
H6 "APT2012SRCPRV" 0805-STANDART-2012-SVET 6608.27,8797.24 r180 top
H7 "APT2012SRCPRV" 0805-STANDART-2012-SVET 6608.27,8442.91 r180 top
H8 "APT2012SRCPRV" 0805-STANDART-2012-SVET 6608.27,8708.66 r180 top
H9 "APT2012CGCK" 0805-STANDART-2012-SVET 6608.27,9899.61 r180 top
H10 "APT2012CGCK" 0805-STANDART-2012-SVET 6608.27,9988.19 r180 top
H11 "APT2012CGCK" 0805-STANDART-2012-SVET 6608.27,10076.77 r180 top
H12 "APT2012CGCK" 0805-STANDART-2012-SVET 6608.27,10165.35 r180 top
H13 "APT2012CGCK" 0805-STANDART-2012-SVET 6608.27,10253.94 r180 top
H14 "APT2012CGCK" 0805-STANDART-2012-SVET 6608.27,10342.52 r180 top
H15 "APT2012CGCK" 0805-STANDART-2012-SVET 6608.27,10431.1 r180 top
H16 "APT2012CGCK" 0805-STANDART-2012-SVET 6608.27,10519.68 r180 top
H17 "APT2012CGCK" 0805-STANDART-2012-SVET 427.17,12291.34 r90 top
H18 "APT2012CGCK" 0805-STANDART-2012-SVET 3074.8,12291.34 r90 top
H19 "APT2012CGCK" 0805-STANDART-2012-SVET 6608.27,7980.31 r180 top
H20 "APT2012CGCK" 0805-STANDART-2012-SVET 6608.27,7881.89 r0 top
H21 "APT2012CGCK" 0805-STANDART-2012-SVET 6608.27,8078.74 r0 top
H22 "APT2012CGCK" 0805-STANDART-2012-SVET 3183.07,12291.34 r90 top
H23 "APT2012CGCK" 0805-STANDART-2012-SVET 6608.27,8196.85 r0 top
H24 "QBLP631-IW" 0805-STANDART-2012-SVET 6608.27,9062.99 r180 top
H25 "QBLP631-IW" 0805-STANDART-2012-SVET 6608.27,8974.41 r180 top
J1 "SPC02SVJN-RC-3POS" PLS-3-2,54 6529.53,11307.09 r180 top
J2 "SPC02SVJN-RC-3POS" PLS-3-2,54 6529.53,11562.99 r180 top
J3 "SPC02SVJN-RC-3POS" PLS-3-2,54 6529.53,11809.06 r180 top
J4 "SPC02SVJN-RC-3POS" PLS-3-2,54 5387.8,11208.66 r0 top
J5 "SPC02SVJN-RC-3POS" PLS-3-2,54 1539.37,7635.83 r180 top
J6 "SPC02SVJN-RC-3POS" PLS-3-2,54 1539.37,7872.05 r180 top
J7 "SPC02SVJN-RC-3POS" PLS-3-2,54 1539.37,7399.61 r180 top
J8 "SPC02SVJN-RC-3POS" PLS-3-2,54 4029.53,11021.65 r0 top
J9 "SPC02SVJN-RC-3POS" PLS-3-2,54 2238.19,8354.33 r180 top
J10 "SPC02SVJN-RC-3POS" PLS-3-2,54 2238.19,8629.92 r180 top
J11 "SPC02SVJN-RC-3POS" PLS-3-2,54 5368.11,9151.57 r0 top
J12 "SPC02SVJN-RC-3POS" PLS-3-2,54 5368.11,9643.7 r0 top
J13 "SPC02SVJN-RC-3POS" PLS-3-2,54 5368.11,9397.64 r0 top
J14 "SPC02SVJN-RC-3POS" PLS-3-2,54 5368.11,9889.76 r180 top
J15 "SPC02SVJN-RC-3POS" PLS-3-2,54 5368.11,10135.83 r180 top
J16 "SPC02SVJN-RC-3POS" PLS-3-2,54 4994.09,9338.58 r90 top
J17 "SPC02SVJN-RC-3POS" PLS-3-2,54 4659.45,9338.58 r90 top
J18 "SPC02SVJN-RC-3POS" PLS-3-2,54 4305.12,9338.58 r90 top
J19 "SPC02SVJN-RC-3POS" PLS-3-2,54 3931.1,9338.58 r90 top
J20 "SPC02SVJN-RC-3POS" PLS-3-2,54 3517.72,9899.61 r90 top
J21 "SPC02SVJN-RC-3POS" PLS-3-2,54 3517.72,9564.96 r90 top
J22 "SPC02SVJN-RC-3POS" PLS-3-2,54 3911.42,10244.09 r90 top
K1 "CPC1008NTR" CPC1017-IXYS 1578.74,4633.86 r270 bottom
K2 "CPC1008NTR" CPC1017-IXYS 1795.28,3305.12 r270 bottom
K3 "CPC1008NTR" CPC1017-IXYS 4157.48,4820.87 r90 bottom
K4 "CPC1008NTR" CPC1017-IXYS 1578.74,4938.98 r270 bottom
K5 "CPC1008NTR" CPC1017-IXYS 624.02,10401.57 r90 top
KW1 "MGSHV-0_2-D1_6xd0.62" MGSHV-0_2-D1_6xd0_62 1618.11,2517.72 r0 top
KW2 "MGSHV-0_2-D1_6xd0.62" MGSHV-0_2-D1_6xd0_62 4364.17,6710.63 r0 top
KW3 "MGSHV-0_2-D1_6xd0.62" MGSHV-0_2-D1_6xd0_62 3714.57,2694.88 r0 top
L1 "SRF0905-100Y" SR0905 643.7,11267.72 r0 bottom
L2 "NLFV32T-1R0M-EF" 1210-STANDART-3225 1362.2,11789.37 r0 bottom
L3 "NLFV32T-1R0M-EF" 1210-STANDART-3225 3114.17,12035.43 r0 bottom
L4 "NLFV32T-1R0M-EF" 1210-STANDART-3225 2877.95,11730.32 r90 bottom
L5 "NLFV32T-1R0M-EF" 1210-STANDART-3225 3596.46,11120.08 r180 bottom
L6 "NLFV32T-1R0M-EF" 1210-STANDART-3225 1155.51,12055.12 r0 bottom
L7 "NLFV32T-1R0M-EF" 1210-STANDART-3225 1165.35,11690.94 r270 bottom
L8 "NLFV32T-1R0M-EF" 1210-STANDART-3225 1116.14,11366.14 r270 bottom
L9 "NLFV32T-1R0M-EF" 1210-STANDART-3225 1539.37,10736.22 r270 bottom
L10 "NLFV32T-1R0M-EF" 1210-STANDART-3225 742.13,10893.7 r270 bottom
L11 "NLFV32T-1R0M-EF" 1210-STANDART-3225 92.52,10893.7 r270 bottom
L12 "NLFV32T-1R0M-EF" 1210-STANDART-3225 3714.57,10913.39 r270 bottom
L13 "SC-10-20JH" SC-J_SC-JH_WE-SMB_UNIVER 5673.23,3482.28 r90 top locked
L14 "SRP1770TA-330M" 1770TA_SERIES_16t9x16t9_H7 3281.5,3797.24 r90 bottom
L15 "SRP1770TA-330M" 1770TA_SERIES_16t9x16t9_H7 4039.37,3807.09 r90 bottom
L16 "SRP1770TA-330M" 1770TA_SERIES_16t9x16t9_H7 1549.21,3905.51 r90 bottom
L17 "NLFV32T-4R7M-EF" 1210-STANDART-3225 289.37,10431.1 r270 top
OSC1 "TP-1_OSC_OSC" CONT_OSC 6421.26,10490.16 r0 bottom
OSC2 "TP-1_OSC_OSC" CONT_OSC 3183.07,8305.12 r0 top
OSC3 "TP-1_OSC_OSC" CONT_OSC 3114.17,8305.12 r0 top
OSC4 "TP-1_OSC_OSC" CONT_OSC 2474.41,7586.61 r0 top
OSC5 "TP-1_OSC_OSC" CONT_OSC 2553.15,7586.61 r0 top
OSC6 "TP-1_OSC_OSC" CONT_OSC 1549.21,8600.39 r0 top
OSC7 "TP-1_OSC_OSC" CONT_OSC 1460.63,8600.39 r0 top
OSC8 "TP-1_OSC_OSC" CONT_OSC 2277.56,4112.2 r0 bottom
OSC9 "TP-1_OSC_OSC" CONT_OSC 1480.32,9377.95 r0 top
OSC10 "TP-1_OSC_OSC" CONT_OSC 1224.41,8925.2 r0 top
OSC11 "TP-1_OSC_OSC" CONT_OSC 1401.57,8669.29 r0 bottom
OSC12 "TP-1_OSC_OSC" CONT_OSC 5151.57,5342.52 r0 top
OSC13 "TP-1_OSC_OSC" CONT_OSC 5328.74,5204.72 r0 bottom
OSC14 "TP-1_OSC_OSC" CONT_OSC 5279.53,5204.72 r0 bottom
OSC15 "TP-1_OSC_OSC" CONT_OSC 2681.1,10755.91 r0 bottom
OSC16 "TP-1_OSC_OSC" CONT_OSC 2779.53,10755.91 r0 bottom
OSC17 "TP-1_OSC_OSC" CONT_OSC 2631.89,10755.91 r0 bottom
OSC18 "TP-1_OSC_OSC" CONT_OSC 2730.32,10755.91 r0 bottom
OSC19 "TP-1_OSC_OSC" CONT_OSC 2828.74,10755.91 r0 bottom
OSC20 "TP-1_OSC_OSC" CONT_OSC 2346.46,9496.06 r0 bottom
OSC21 "TP-1_OSC_OSC" CONT_OSC 2513.78,9496.06 r0 bottom
OSC22 "TP-1_OSC_OSC" CONT_OSC 2179.13,9496.06 r0 bottom
OSC23 "TP-1_OSC_OSC" CONT_OSC 2267.72,9496.06 r0 bottom
OSC24 "TP-1_OSC_OSC" CONT_OSC 2435.04,9496.06 r0 bottom
OSC25 "TP-1_OSC_OSC" CONT_OSC 5210.63,6375.98 r0 bottom
OSC26 "TP-1_OSC_OSC" CONT_OSC 5387.8,6346.46 r0 bottom
OSC27 "TP-1_OSC_OSC" CONT_OSC 2750,5588.58 r0 bottom
OSC28 "TP-1_OSC_OSC" CONT_OSC 1529.53,5411.42 r0 bottom
OSC29 "TP-1_OSC_OSC" CONT_OSC 1529.53,5352.36 r0 bottom
OSC30 "TP-1_OSC_OSC" CONT_OSC 5190.94,8433.07 r0 bottom
OSC31 "TP-1_OSC_OSC" CONT_OSC 5269.69,8433.07 r0 bottom
OSC32 "TP-1_OSC_OSC" CONT_OSC 2435.04,8984.25 r0 top
OSC33 "TP-1_OSC_OSC" CONT_OSC 2435.04,9141.73 r0 top
R1 "5-1879022-3" SMW-SMF-3W 1204.72,7251.97 r90 top
R2 "5-1879022-3" SMW-SMF-3W 958.66,7645.67 r90 top
R3 "PWR163S-25-R100FE" DPAK-PWR163-BOURNS 2405.51,5576.77 r0 bottom locked
R4 "PWR163S-25-R100FE" DPAK-PWR163-BOURNS 663.39,8224.41 r0 bottom locked
R5 "ERJ-3GEY0R00V" 0603-STANDART-1608 6303.15,10007.87 r270 bottom
R6 "ERJ-3GEY0R00V" 0603-STANDART-1608 4875.98,11041.34 r270 top
R7 "ERJ-3GEY0R00V" 0603-STANDART-1608 6381.89,10716.54 r0 bottom
R8 "ERJ-3GEY0R00V" 0603-STANDART-1608 4433.07,11533.46 r270 top
R9 "ERJ-3GEY0R00V" 0603-STANDART-1608 4492.13,11533.46 r270 top
R10 "ERJ-3GEY0R00V" 0603-STANDART-1608 5722.44,10903.54 r180 top
R11 "ERJ-3GEY0R00V" 0603-STANDART-1608 4974.41,11041.34 r270 top
R12 "ERJ-3GEY0R00V" 0603-STANDART-1608 4314.96,11041.34 r270 top
R13 "ERJ-3GEY0R00V" 0603-STANDART-1608 4492.13,11041.34 r270 top
R14 "ERJ-3GEY0R00V" 0603-STANDART-1608 4551.18,11041.34 r270 top
R15 "ERJ-3GEY0R00V" 0603-STANDART-1608 4728.35,11041.34 r270 top
R16 "ERJ-3GEY0R00V" 0603-STANDART-1608 4728.35,11041.34 r270 bottom
R17 "ERJ-3GEY0R00V" 0603-STANDART-1608 4551.18,11041.34 r270 bottom
R18 "ERJ-3GEY0R00V" 0603-STANDART-1608 4492.13,11041.34 r270 bottom
R19 "ERJ-3GEY0R00V" 0603-STANDART-1608 4314.96,11041.34 r270 bottom
R20 "ERJ-3GEY0R00V" 0603-STANDART-1608 4551.18,11533.46 r270 top
R21 "ERJ-3GEY0R00V" 0603-STANDART-1608 4610.24,11533.46 r270 top
R22 "ERJ-3GEY0R00V" 0603-STANDART-1608 4541.34,11543.31 r270 bottom
R23 "ERJ-3GEY0R00V" 0603-STANDART-1608 4482.28,11543.31 r270 bottom
R24 "ERJ-3GEY0R00V" 0603-STANDART-1608 4423.23,11543.31 r270 bottom
R25 "ERJ-3GEY0R00V" 0603-STANDART-1608 4364.17,11543.31 r270 bottom
R26 "ERJ-3GEY0R00V" 0603-STANDART-1608 5742.13,12064.96 r90 bottom
R27 "ERJ-3GEY0R00V" 0603-STANDART-1608 5564.96,12064.96 r270 bottom
R28 "ERJ-3GEY0R00V" 0603-STANDART-1608 5624.02,12064.96 r90 bottom
R29 "ERJ-3GEY0R00V" 0603-STANDART-1608 5446.85,12064.96 r270 bottom
R30 "ERJ-3GEY0R00V" 0603-STANDART-1608 5387.8,12064.96 r90 bottom
R31 "ERJ-3GEY0R00V" 0603-STANDART-1608 5505.91,12064.96 r270 bottom
R32 "ERJ-3GEY0R00V" 0603-STANDART-1608 5279.53,12094.49 r0 bottom
R33 "ERJ-3GEY0R00V" 0603-STANDART-1608 4570.87,12045.28 r90 bottom
R34 "ERJ-3GEY0R00V" 0603-STANDART-1608 4639.76,12045.28 r270 bottom
R35 "ERJ-3GEY0R00V" 0603-STANDART-1608 3488.19,7379.92 r90 top
R36 "ERJ-3GEY0R00V" 0603-STANDART-1608 2169.29,7438.98 r90 top
R37 "ERJ-3GEY0R00V" 0603-STANDART-1608 3616.14,7409.45 r90 top
R38 "ERJ-3GEY0R00V" 0603-STANDART-1608 2041.34,7379.92 r90 top
R39 "ERJ-3GEY0R00V" 0603-STANDART-1608 2435.04,7438.98 r0 top
R40 "ERJ-3GEY0R00V" 0603-STANDART-1608 2759.84,7429.13 r0 top
R41 "ERJ-3GEY0R00V" 0603-STANDART-1608 2759.84,7370.08 r0 top
R42 "ERJ-3GEY0R00V" 0603-STANDART-1608 2297.24,7685.04 r180 bottom
R43 "ERJ-3GEY0R00V" 0603-STANDART-1608 1992.13,7950.79 r90 top
R44 "ERJ-3GEY0R00V" 0603-STANDART-1608 1814.96,7950.79 r90 top
R45 "ERJ-3GEY0R00V" 0603-STANDART-1608 3251.97,8206.69 r270 top
R46 "ERJ-3GEY0R00V" 0603-STANDART-1608 3114.17,8206.69 r90 top
R47 "ERJ-3GEY0R00V" 0603-STANDART-1608 3625.98,8177.17 r0 top
R48 "ERJ-3GEY0R00V" 0603-STANDART-1608 3183.07,8206.69 r270 top
R49 "ERJ-3GEY0R00V" 0603-STANDART-1608 3320.87,8206.69 r270 top
R50 "ERJ-3GEY0R00V" 0603-STANDART-1608 2297.24,7803.15 r180 bottom
R51 "ERJ-3GEY0R00V" 0603-STANDART-1608 3202.76,7438.98 r270 bottom
R52 "ERJ-3GEY0R00V" 0603-STANDART-1608 3202.76,7606.3 r270 bottom
R53 "ERJ-3GEY0R00V" 0603-STANDART-1608 2730.32,7448.82 r270 bottom
R54 "ERJ-3GEY0R00V" 0603-STANDART-1608 1470.47,9181.1 r0 top
R55 "ERJ-3GEY0R00V" 0603-STANDART-1608 1982.28,8629.92 r180 top
R56 "ERJ-3GEY0R00V" 0603-STANDART-1608 1854.33,8570.87 r180 top
R57 "ERJ-3GEY0R00V" 0603-STANDART-1608 1037.4,9663.39 r180 bottom
R58 "ERJ-3GEY0R00V" 0603-STANDART-1608 1037.4,9781.5 r180 bottom
R59 "ERJ-3GEY0R00V" 0603-STANDART-1608 1696.85,8984.25 r0 bottom
R60 "ERJ-3GEY0R00V" 0603-STANDART-1608 1175.2,8846.46 r270 bottom
R61 "ERJ-3GEY0R00V" 0603-STANDART-1608 5230.31,5844.49 r90 bottom
R62 "ERJ-3GEY0R00V" 0603-STANDART-1608 5476.38,6129.92 r0 bottom
R63 "ERJ-3GEY0R00V" 0603-STANDART-1608 5417.32,6228.35 r180 bottom
R64 "ERJ-3GEY0R00V" 0603-STANDART-1608 5633.86,5598.43 r0 top
R65 "ERJ-3GEY0R00V" 0603-STANDART-1608 5633.86,5716.54 r0 top
R66 "ERJ-3GEY0R00V" 0603-STANDART-1608 5879.92,5244.09 r270 bottom
R67 "ERJ-3GEY0R00V" 0603-STANDART-1608 5210.63,5273.62 r270 bottom
R68 "ERJ-3GEY0R00V" 0603-STANDART-1608 5131.89,6159.45 r270 bottom
R69 "ERJ-3GEY0R00V" 0603-STANDART-1608 653.54,10549.21 r0 top
R70 "ERJ-3GEY0R00V" 0603-STANDART-1608 3202.76,10145.67 r90 bottom locked
R71 "ERJ-3GEY0R00V" 0603-STANDART-1608 2336.61,10854.33 r90 top
R72 "ERJ-3GEY0R00V" 0603-STANDART-1608 2533.46,10854.33 r90 top
R73 "ERJ-3GEY0R00V" 0603-STANDART-1608 2730.32,10893.7 r90 top
R74 "ERJ-3GEY0R00V" 0603-STANDART-1608 2435.04,10854.33 r90 top
R75 "ERJ-3GEY0R00V" 0603-STANDART-1608 2651.57,10893.7 r90 top
R76 "ERJ-3GEY0R00V" 0603-STANDART-1608 2986.22,10913.39 r90 top
R77 "ERJ-3GEY0R00V" 0603-STANDART-1608 5653.54,7734.25 r0 top
R78 "ERJ-3GEY0R00V" 0603-STANDART-1608 4570.87,6651.57 r90 top
R79 "ERJ-3GEY0R00V" 0603-STANDART-1608 5092.52,7183.07 r0 top
R80 "ERJ-3GEY0R00V" 0603-STANDART-1608 5732.28,7990.16 r180 bottom
R81 "ERJ-3GEY0R00V" 0603-STANDART-1608 6263.78,8157.48 r0 bottom
R82 "ERJ-3GEY0R00V" 0603-STANDART-1608 6263.78,8029.53 r0 bottom
R83 "ERJ-3GEY0R00V" 0603-STANDART-1608 5190.94,7202.76 r270 top
R84 "ERJ-3GEY0R00V" 0603-STANDART-1608 4944.88,6720.47 r180 bottom
R85 "ERJ-3GEY0R00V" 0603-STANDART-1608 4944.88,6838.58 r180 bottom
R86 "ERJ-3GEY0R00V" 0603-STANDART-1608 4777.56,6464.57 r180 bottom
R87 "ERJ-3GEY0R00V" 0603-STANDART-1608 5299.21,6159.45 r180 top
R88 "ERJ-3GEY0R00V" 0603-STANDART-1608 5299.21,6228.35 r180 top
R89 "ERJ-3GEY0R00V" 0603-STANDART-1608 5299.21,6366.14 r180 top
R90 "ERJ-3GEY0R00V" 0603-STANDART-1608 3783.46,4889.76 r90 bottom
R91 "ERJ-3GEY0R00V" 0603-STANDART-1608 4108.27,5677.17 r270 bottom
R92 "ERJ-3GEY0R00V" 0603-STANDART-1608 4206.69,5814.96 r180 bottom
R93 "ERJ-3GEY0R00V" 0603-STANDART-1608 3311.02,5145.67 r0 bottom
R94 "ERJ-3GEY0R00V" 0603-STANDART-1608 3311.02,5027.56 r0 bottom
R95 "ERJ-3GEY0R00V" 0603-STANDART-1608 3793.31,5470.47 r270 bottom
R96 "ERJ-3GEY0R00V" 0603-STANDART-1608 1578.74,5490.16 r180 bottom
R97 "ERJ-3GEY0R00V" 0603-STANDART-1608 4009.84,5066.93 r90 bottom
R98 "ERJ-3GEY0R00V" 0603-STANDART-1608 4580.71,6090.55 r90 top
R99 "ERJ-3GEY0R00V" 0603-STANDART-1608 4501.97,6503.94 r270 top
R100 "ERJ-3GEY0R00V" 0603-STANDART-1608 4590.55,6503.94 r270 top
R101 "ERJ-3GEY0R00V" 0603-STANDART-1608 6165.35,8787.4 r0 top
R102 "ERJ-3GEY0R00V" 0603-STANDART-1608 5889.76,8984.25 r180 top
R103 "ERJ-3GEY0R00V" 0603-STANDART-1608 5968.5,8767.72 r180 top
R104 "ERJ-3GEY0R00V" 0603-STANDART-1608 6165.35,8915.35 r0 top
R105 "ERJ-3GEY0R00V" 0603-STANDART-1608 6135.83,9033.46 r0 top
R106 "ERJ-3GEY0R00V" 0603-STANDART-1608 6273.62,8688.98 r90 bottom
R107 "ERJ-3GEY0R00V" 0603-STANDART-1608 4728.35,8688.98 r90 top
R108 "ERJ-3GEY0R00V" 0603-STANDART-1608 3931.1,8580.71 r0 bottom
R109 "ERJ-3GEY0R00V" 0603-STANDART-1608 4167.32,8039.37 r180 bottom
R110 "ERJ-3GEY0R00V" 0603-STANDART-1608 4433.07,8393.7 r0 top
R111 "ERJ-3GEY0R00V" 0603-STANDART-1608 4167.32,8255.91 r180 bottom
R112 "ERJ-3GEY0R00V" 0603-STANDART-1608 3704.72,8108.27 r180 bottom
R113 "ERJ-3GEY0R00V" 0603-STANDART-1608 4994.09,8334.65 r270 bottom
R114 "ERJ-3GEY0R00V" 0603-STANDART-1608 5122.05,8344.49 r90 bottom
R115 "ERJ-3GEY0R00V" 0603-STANDART-1608 5338.58,8344.49 r90 bottom
R116 "ERJ-3GEY0R00V" 0603-STANDART-1608 5190.94,8344.49 r270 bottom
R117 "ERJ-3GEY0R00V" 0603-STANDART-1608 5269.69,8344.49 r270 bottom
R118 "ERJ-3GEY0R00V" 0603-STANDART-1608 3685.04,8285.43 r180 top
R119 "ERJ-3GEY0R00V" 0603-STANDART-1608 4167.32,8118.11 r180 bottom
R120 "ERJ-3GEY0R00V" 0603-STANDART-1608 4836.61,8639.76 r90 top
R121 "ERJ-3GEY0R00V" 0603-STANDART-1608 4600.39,10312.99 r180 bottom
R122 "ERJ-3GEY0R00V" 0603-STANDART-1608 4462.6,10116.14 r270 top
R123 "ERJ-3GEY0R00V" 0603-STANDART-1608 4511.81,9909.45 r180 bottom
R124 "ERJ-3GEY0R00V" 0603-STANDART-1608 4334.65,10135.83 r0 bottom
R125 "ERJ-3GEY0R00V" 0603-STANDART-1608 2523.62,9220.47 r180 bottom
R126 "CRCW251275K0JNEG" 2512-STANDART-6332 6312.99,6385.83 r90 bottom
R127 "CRCW251275K0JNEG" 2512-STANDART-6332 6312.99,6385.83 r270 top
R128 "CRCW251275K0JNEG" 2512-STANDART-6332 6076.77,6385.83 r270 bottom
R129 "CRCW251275K0JNEG" 2512-STANDART-6332 6076.77,6385.83 r90 top
R130 "CRCW251275K0JNEG" 2512-STANDART-6332 2011.81,2675.2 r0 top
R131 "CRCW251275K0JNEG" 2512-STANDART-6332 1627.95,2675.2 r0 top
R132 "ERJ-3EKF6200V" 0603-STANDART-1608 6411.42,10017.72 r0 bottom
R133 "ERJ-3EKF6200V" 0603-STANDART-1608 6411.42,10076.77 r0 bottom
R134 "ERJ-3EKF6200V" 0603-STANDART-1608 6411.42,10135.83 r0 bottom
R135 "ERJ-3EKF6200V" 0603-STANDART-1608 6411.42,10194.88 r0 bottom
R136 "ERJ-3EKF6200V" 0603-STANDART-1608 6411.42,10253.94 r0 bottom
R137 "ERJ-3EKF6200V" 0603-STANDART-1608 6411.42,10312.99 r0 bottom
R138 "ERJ-3EKF6200V" 0603-STANDART-1608 6411.42,10372.05 r0 bottom
R139 "ERJ-3EKF6200V" 0603-STANDART-1608 6411.42,10431.1 r0 bottom
R140 "ERJ-3EKF6200V" 0603-STANDART-1608 1332.68,9053.15 r90 top
R141 "ERJ-3EKF6200V" 0603-STANDART-1608 5053.15,5844.49 r90 bottom
R142 "ERJ-3EKF6200V" 0603-STANDART-1608 5555.12,7665.35 r0 bottom
R143 "ERJ-3EKF6200V" 0603-STANDART-1608 5190.94,7301.18 r270 bottom
R144 "ERJ-3EKF6200V" 0603-STANDART-1608 5259.84,7301.18 r270 bottom
R145 "ERJ-3EKF6200V" 0603-STANDART-1608 3064.96,12124.02 r270 top
R146 "ERJ-3EKF6200V" 0603-STANDART-1608 6431.1,7980.31 r180 top
R147 "ERJ-3EKF6200V" 0603-STANDART-1608 6431.1,7881.89 r180 bottom
R148 "ERJ-3EKF6200V" 0603-STANDART-1608 2789.37,9988.19 r90 bottom
R149 "ERJ-3EKF6200V" 0603-STANDART-1608 2661.42,9988.19 r90 bottom
R150 "ERJ-3EKF6200V" 0603-STANDART-1608 2592.52,9988.19 r90 bottom
R151 "ERJ-3EKF6200V" 0603-STANDART-1608 6500,8196.85 r180 bottom
R152 "ERJ-3EKF6200V" 0603-STANDART-1608 4679.13,6631.89 r90 top
R153 "ERJ-3EKF6200V" 0603-STANDART-1608 3685.04,4968.5 r270 bottom
R154 "ERJ-3EKF6200V" 0603-STANDART-1608 4580.71,5942.91 r90 top
R155 "ERJ-3EKF6200V" 0603-STANDART-1608 6440.94,8531.5 r0 bottom